# Altium PCB Side_PCB.PcbDoc (part 3 of 3)
Units mm, origin at the board's own origin, x right, y up, seen from the top; angles counter-clockwise.
Board outline 49.91 x 43.31 mm, 2 copper layers (Top Layer, Bottom Layer), stack 1.448 mm thick; 43 components, 50 nets, 194 pads, 110 vias.
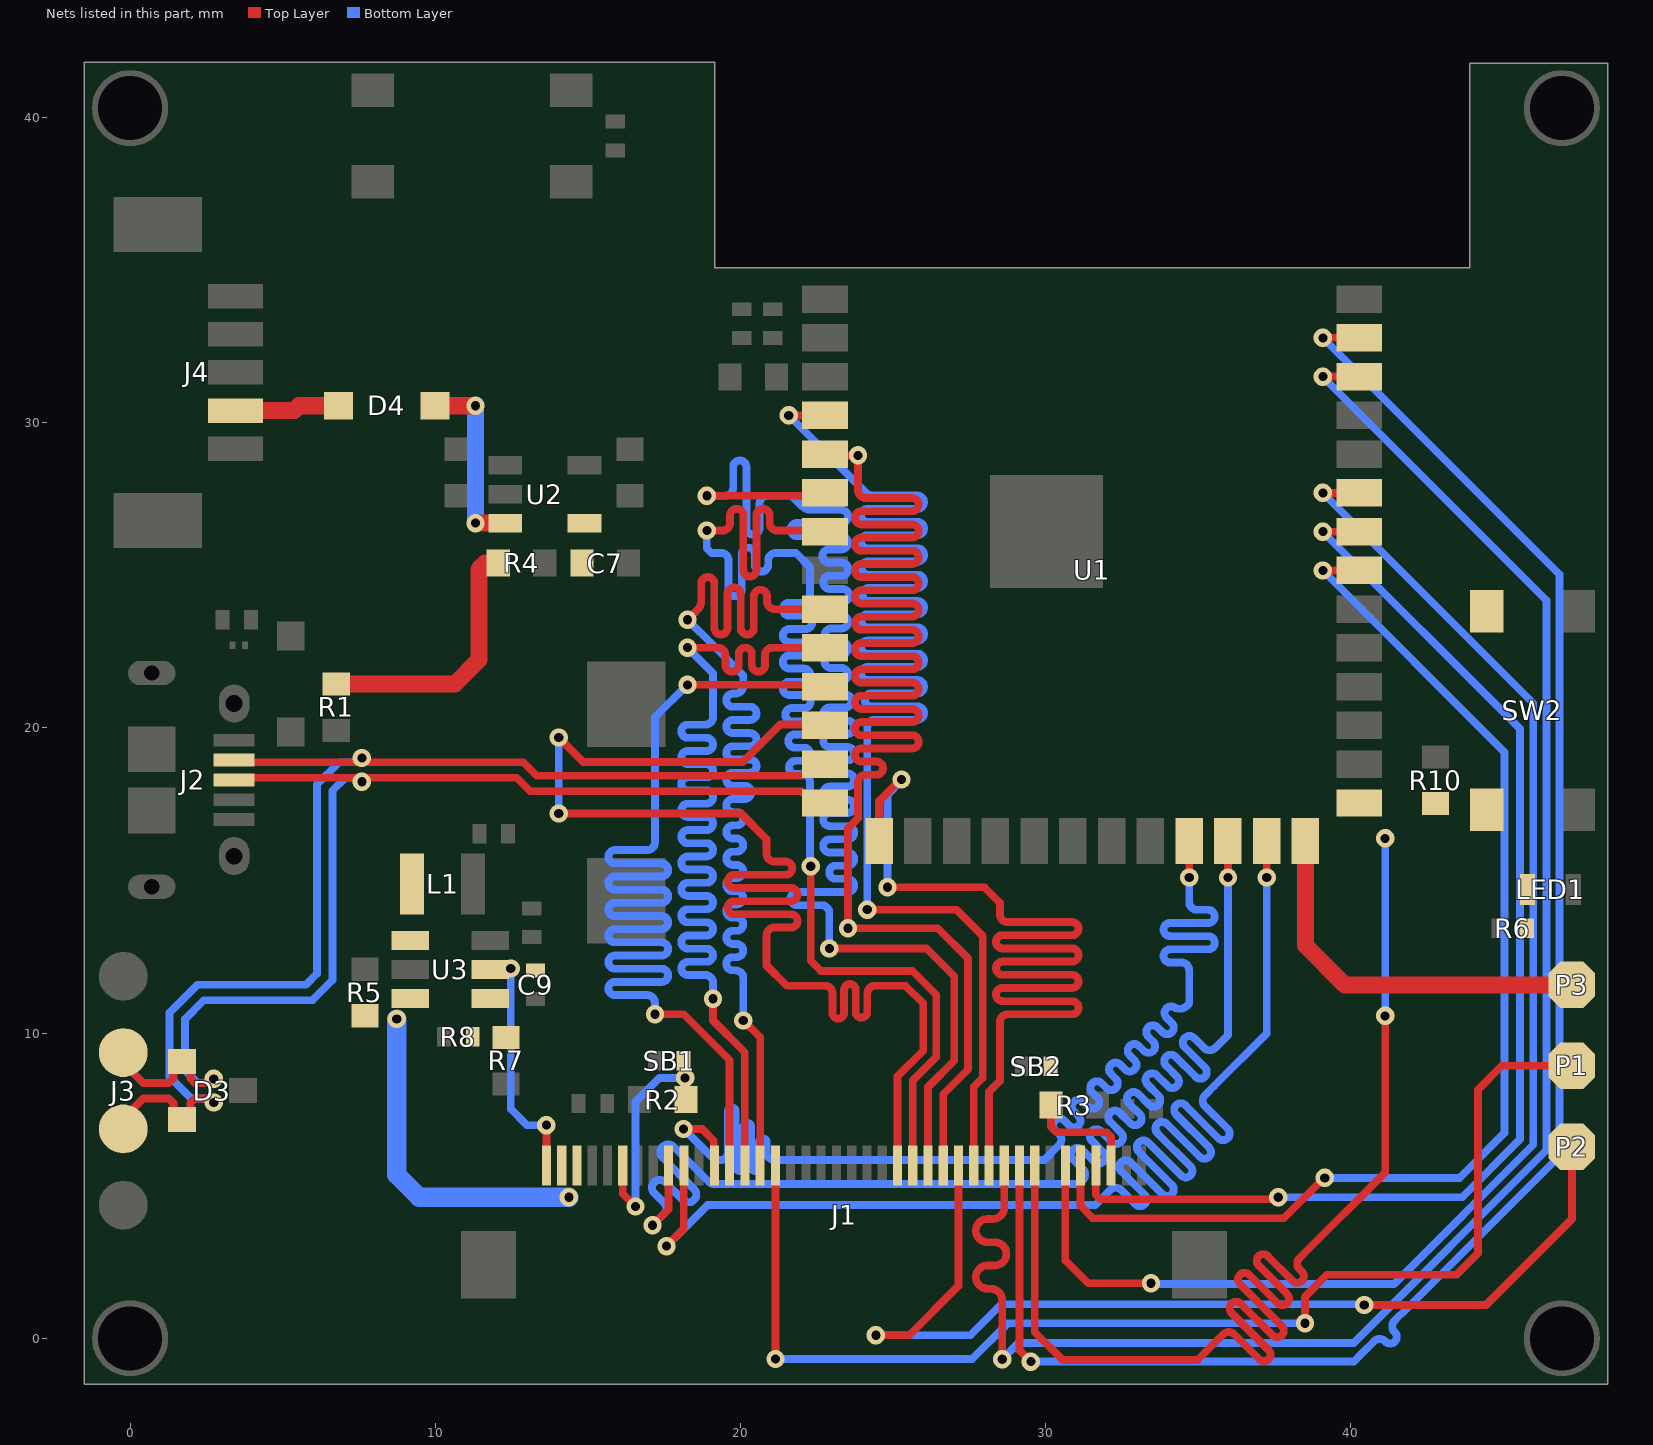
[diagram p2: the nets of this part, all layers, seen from the top]

## Via types
v1: diameter 0.6, hole 0.3, Top Layer to Bottom Layer, tented both sides, 102 vias
v2: diameter 0.6, hole 0.3, Top Layer to Bottom Layer, 8 vias

## Nets (pads, with @x,y where several pads share a name; then routed paths per layer and width w, separated by ;. In a path a pad name is that pad's centre, name@x,y a point inside that pad or via, vN(x,y) a via of type N, cw(c..) or ccw(c..) an arc to the next point about the centre after c; other vN are vias at no path point) (continued)
LCD_DB8: J1.24 U1.12 | length 48
  Top Layer w0.254: v1(14.046,17.196) 20.015,17.196 20.853,16.358 20.853,16.002 20.853,15.875 ccw(c21.107,15.875) 21.107,15.621 21.481,15.621 cw(c21.481,15.405) 21.481,15.189 19.799,15.189 ccw(c19.799,14.973) 19.799,14.757 21.653,14.757 cw(c21.653,14.541) 21.653,14.326 19.799,14.326 ccw(c19.799,14.11) 19.799,13.894 21.653,13.894 cw(c21.653,13.678) 21.653,13.462 21.107,13.462 ccw(c21.107,13.208) 20.853,13.208 20.853,12.55 20.853,12.217 21.514,11.557 21.717,11.557 22.758,11.557 cw(c22.758,11.303) 23.012,11.303 23.012,10.663 ccw(c23.203,10.663) 23.393,10.663 23.393,11.417 cw(c23.584,11.417) 23.774,11.417 23.774,10.698 ccw(c23.965,10.698) 24.155,10.698 24.155,11.303 cw(c24.409,11.303) 24.409,11.557 24.536,11.557 25.404,11.557 25.984,10.976 25.984,9.423 25.143,8.583 J1.24@25.143,5.664 ; v1(14.046,19.685) 14.849,18.883 20.076,18.883 21.311,20.117 U1.12@22.736,20.117
  Bottom Layer w0.254: v1(14.046,17.196) v1(14.046,19.685)
LCD_DB9: J1.25 U1.7 | length 49.5
  Top Layer w0.254: v1(18.898,26.467) 19.279,26.467 19.406,26.467 ccw(c19.406,26.721) 19.66,26.721 19.66,26.962 cw(c19.876,26.962) 20.091,26.962 20.091,25.177 ccw(c20.307,25.177) 20.523,25.177 20.523,26.962 cw(c20.739,26.962) 20.955,26.962 20.955,26.721 ccw(c21.209,26.721) 21.209,26.467 21.641,26.467 22.736,26.467 U1.7@22.771,26.431 ; v1(22.301,15.469) 22.301,12.37 22.631,12.04 25.629,12.04 26.416,11.252 26.416,9.22 25.643,8.448 J1.25@25.643,5.664
  Bottom Layer w0.254: v1(18.898,26.467) 18.898,25.885 18.923,25.86 19.046,25.736 19.357,25.736 cw(c19.357,25.482) 19.611,25.482 19.611,24.533 ccw(c19.827,24.533) 20.042,24.533 20.042,25.692 cw(c20.258,25.692) 20.474,25.692 20.474,25.339 ccw(c20.69,25.339) 20.906,25.339 20.906,25.482 cw(c21.16,25.482) 21.16,25.736 21.287,25.736 21.813,25.736 22.276,25.273 22.276,24.917 22.276,24.359 cw(c22.022,24.359) 22.022,24.105 21.603,24.105 ccw(c21.603,23.889) 21.603,23.673 22.131,23.673 cw(c22.131,23.457) 22.131,23.241 21.603,23.241 ccw(c21.603,23.025) 21.603,22.809 22.118,22.809 cw(c22.118,22.593) 22.118,22.377 21.603,22.377 ccw(c21.603,22.161) 21.603,21.946 22.074,21.946 cw(c22.074,21.73) 22.074,21.514 21.603,21.514 ccw(c21.603,21.298) 21.603,21.082 22.083,21.082 cw(c22.083,20.866) 22.083,20.65 21.686,20.65 ccw(c21.686,20.434) 21.686,20.218 22.074,20.218 cw(c22.074,20.002) 22.074,19.787 21.778,19.787 ccw(c21.778,19.571) 21.778,19.355 22.074,19.355 cw(c22.074,19.139) 22.074,18.923 21.806,18.923 ccw(c21.806,18.707) 21.806,18.491 22.022,18.491 cw(c22.022,18.237) 22.276,18.237 22.276,17.551 22.276,15.494 v1(22.301,15.469)
LCD_DB10: J1.26 U1.6 | length 63.4
  Top Layer w0.254: v1(18.898,27.61) 22.68,27.61 U1.6@22.771,27.701 ; v1(22.911,12.776) 26.086,12.776 27,11.862 27,9.093 26.143,8.236 J1.26@26.143,5.664
  Bottom Layer w0.254: v1(18.898,27.61) 19.38,27.61 19.507,27.61 ccw(c19.507,27.864) 19.761,27.864 19.761,28.549 cw(c19.977,28.549) 20.193,28.549 20.193,26.556 ccw(c20.409,26.556) 20.625,26.556 20.625,27.356 cw(c20.879,27.356) 20.879,27.61 21.641,27.61 21.672,27.61 21.901,27.381 22.028,27.254 22.029,27.253 ccw(c22.289,27.515) 22.289,27.146 23.304,27.146 cw(c23.304,26.93) 23.304,26.714 21.857,26.714 ccw(c21.857,26.498) 21.857,26.283 23.304,26.283 cw(c23.304,26.067) 23.304,25.851 22.898,25.851 ccw(c22.898,25.635) 22.898,25.419 23.312,25.419 cw(c23.312,25.203) 23.312,24.987 22.923,24.987 ccw(c22.923,24.771) 22.923,24.555 23.349,24.555 cw(c23.349,24.339) 23.349,24.124 22.984,24.124 ccw(c22.984,23.908) 22.984,23.692 23.307,23.692 cw(c23.307,23.476) 23.307,23.26 22.981,23.26 ccw(c22.981,23.044) 22.981,22.828 23.304,22.828 cw(c23.304,22.612) 23.304,22.396 22.968,22.396 ccw(c22.968,22.18) 22.968,21.965 23.305,21.965 cw(c23.305,21.749) 23.305,21.533 22.924,21.533 ccw(c22.924,21.317) 22.924,21.101 23.427,21.101 cw(c23.427,20.885) 23.427,20.669 22.923,20.669 ccw(c22.923,20.453) 22.923,20.237 23.508,20.237 cw(c23.508,20.021) 23.508,19.806 22.923,19.806 ccw(c22.923,19.59) 22.923,19.374 23.508,19.374 cw(c23.508,19.158) 23.508,18.942 22.923,18.942 ccw(c22.923,18.726) 22.923,18.51 23.508,18.51 cw(c23.508,18.294) 23.508,18.078 22.923,18.078 ccw(c22.923,17.862) 22.923,17.647 23.508,17.647 cw(c23.508,17.431) 23.508,17.215 22.923,17.215 ccw(c22.923,16.999) 22.923,16.783 23.508,16.783 cw(c23.508,16.567) 23.508,16.351 22.923,16.351 ccw(c22.923,16.135) 22.923,15.919 23.508,15.919 cw(c23.508,15.703) 23.508,15.488 23.122,15.488 ccw(c23.122,15.272) 23.122,15.056 23.508,15.056 cw(c23.508,14.84) 23.508,14.624 21.857,14.624 ccw(c21.857,14.408) 21.857,14.192 22.657,14.192 cw(c22.657,13.938) 22.911,13.938 22.911,13.016 v1@22.911,12.645
LCD_DB11: J1.27 U1.5 | length 67.5
  Top Layer w0.254: U1.5@22.771,28.971 22.812,28.931 v1(23.851,28.931) 23.851,28.372 23.851,27.788 ccw(c24.105,27.788) 24.105,27.534 25.623,27.534 cw(c25.623,27.318) 25.623,27.102 23.966,27.102 ccw(c23.966,26.886) 23.966,26.67 25.623,26.67 cw(c25.623,26.454) 25.623,26.238 23.966,26.238 ccw(c23.966,26.022) 23.966,25.806 25.623,25.806 cw(c25.623,25.591) 25.623,25.375 23.966,25.375 ccw(c23.966,25.159) 23.966,24.943 25.623,24.943 cw(c25.623,24.727) 25.623,24.511 23.966,24.511 ccw(c23.966,24.295) 23.966,24.079 25.623,24.079 cw(c25.623,23.863) 25.623,23.647 23.966,23.647 ccw(c23.966,23.432) 23.966,23.216 25.623,23.216 cw(c25.623,23) 25.623,22.784 23.966,22.784 ccw(c23.966,22.568) 23.966,22.352 25.623,22.352 cw(c25.623,22.136) 25.623,21.92 23.966,21.92 ccw(c23.966,21.704) 23.966,21.488 25.623,21.488 cw(c25.623,21.273) 25.623,21.057 23.966,21.057 ccw(c23.966,20.841) 23.966,20.625 25.623,20.625 cw(c25.623,20.409) 25.623,20.193 23.966,20.193 ccw(c23.966,19.977) 23.966,19.761 25.623,19.761 cw(c25.623,19.545) 25.623,19.329 23.966,19.329 ccw(c23.966,19.114) 23.966,18.898 24.452,18.898 cw(c24.452,18.682) 24.452,18.466 24.105,18.466 ccw(c24.105,18.212) 23.851,18.212 23.851,17.653 23.851,17.043 23.52,16.713 v1(23.52,13.437) 26.467,13.437 27.457,12.446 27.457,8.814 26.643,8 J1.27@26.643,5.664
LCD_DB13: J1.29 U1.4 | length 63.3
  Top Layer w0.254: v1(21.581,30.241) U1.4@22.771,30.241 ; v1(24.155,14.046) 27.076,14.046 27.94,13.183 27.94,8.534 27.643,8.238 J1.29@27.643,5.664
  Bottom Layer w0.254: v1(21.581,30.241) 23.974,27.848 24.101,27.721 ccw(c24.362,27.981) 24.362,27.613 25.798,27.613 cw(c25.798,27.397) 25.798,27.181 24.168,27.181 ccw(c24.168,26.965) 24.168,26.749 25.798,26.749 cw(c25.798,26.533) 25.798,26.317 24.168,26.317 ccw(c24.168,26.101) 24.168,25.885 25.798,25.885 cw(c25.798,25.669) 25.798,25.454 24.176,25.454 ccw(c24.176,25.238) 24.176,25.022 25.798,25.022 cw(c25.798,24.806) 25.798,24.59 24.213,24.59 ccw(c24.213,24.374) 24.213,24.158 25.798,24.158 cw(c25.798,23.942) 25.798,23.726 24.171,23.726 ccw(c24.171,23.51) 24.171,23.295 25.798,23.295 cw(c25.798,23.079) 25.798,22.863 24.168,22.863 ccw(c24.168,22.647) 24.168,22.431 25.798,22.431 cw(c25.798,22.215) 25.798,21.999 24.169,21.999 ccw(c24.169,21.783) 24.169,21.567 25.798,21.567 cw(c25.798,21.351) 25.798,21.136 24.291,21.136 ccw(c24.291,20.92) 24.291,20.704 25.798,20.704 cw(c25.798,20.488) 25.798,20.272 24.409,20.272 ccw(c24.409,20.018) 24.155,20.018 24.155,19.228 v1(24.155,14.046)
LCD_DB14: J1.30 U1.15 | length 38.6
  Top Layer w0.254: U1.15@24.541,16.291 24.541,17.607 25.248,18.313 v1(25.273,18.313) ; v1(24.816,14.783) 27.991,14.783 28.499,14.275 28.499,14.021 28.499,13.894 ccw(c28.753,13.894) 28.753,13.64 30.86,13.64 cw(c30.86,13.424) 30.86,13.208 28.588,13.208 ccw(c28.588,12.992) 28.588,12.776 30.86,12.776 cw(c30.86,12.56) 30.86,12.344 28.588,12.344 ccw(c28.588,12.128) 28.588,11.913 30.86,11.913 cw(c30.86,11.697) 30.86,11.481 28.588,11.481 ccw(c28.588,11.265) 28.588,11.049 30.86,11.049 cw(c30.86,10.833) 30.86,10.617 28.753,10.617 ccw(c28.753,10.363) 28.499,10.363 28.499,8.433 28.143,8.077 J1.30@28.143,5.664
  Bottom Layer w0.254: v1(24.816,14.783) 24.816,17.808 25.273,18.265 v1(25.273,18.313)
LCD_DB15: J1.31 U1.38 | length 59.1
  Top Layer w0.254: v1(28.575,-0.686) 28.575,1.118 28.575,1.245 ccw(c28.194,1.245) 28.194,1.626 28.091,1.626 cw(c28.091,2.007) 28.091,2.388 28.331,2.388 ccw(c28.331,2.769) 28.331,3.15 28.091,3.15 cw(c28.091,3.531) 28.091,3.912 28.262,3.912 ccw(c28.262,4.293) 28.643,4.293 28.643,5.59 J1.31@28.643,5.664 ; v1(39.081,31.511) U1.38@40.271,31.511
  Bottom Layer w0.254: v1(28.575,-0.686) 29.108,-0.152 40.091,-0.152 46.406,6.163 46.406,24.186 v1(39.081,31.511)
LCD_DB16: J1.32 U1.39 | length 58.5
  Top Layer w0.254: J1.32@29.143,5.664 29.143,-0.391 v1(29.515,-0.762) ; v1(39.081,32.781) U1.39@40.271,32.781
  Bottom Layer w0.254: v1(29.515,-0.762) 40.092,-0.762 40.366,-0.488 40.761,-0.093 cw(c40.941,-0.272) 41.12,-0.093 41.135,-0.108 ccw(c41.288,0.045) 41.441,-0.108 ccw(c41.288,0.045) 41.441,0.197 41.425,0.213 cw(c41.605,0.392) 41.425,0.572 41.876,1.023 46.838,5.984 46.838,25.024 v1(39.081,32.781)
LCD_DB17: J1.33 R10.2 SW2.1 SW2.2 U1.27 | length 43
  Top Layer w0.254: J1.33@29.643,5.664 29.643,0.202 30.556,-0.711 34.976,-0.711 35.065,-0.621 35.819,0.132 cw(c35.998,-0.048) 36.178,0.132 36.996,-0.686 ccw(c37.149,-0.533) 37.301,-0.686 ccw(c37.149,-0.533) 37.301,-0.381 36.089,0.831 cw(c36.242,0.984) 36.089,1.136 cw(c36.242,0.984) 36.395,1.136 37.432,0.1 ccw(c37.584,0.252) 37.737,0.1 ccw(c37.584,0.252) 37.737,0.405 36.365,1.777 cw(c36.518,1.93) 36.365,2.082 cw(c36.518,1.93) 36.67,2.082 37.605,1.148 ccw(c37.757,1.301) 37.91,1.148 ccw(c37.757,1.301) 37.91,1.453 36.976,2.388 cw(c37.128,2.54) 36.976,2.693 cw(c37.128,2.54) 37.281,2.693 38.093,1.881 ccw(c38.246,2.033) 38.398,1.881 ccw(c38.246,2.033) 38.398,2.186 38.315,2.269 cw(c38.495,2.449) 38.315,2.628 38.405,2.718 41.123,5.436 v1(41.123,10.566)
  Bottom Layer w0.254: v1(41.123,10.566) v1(41.123,16.383)
LCD_DE: J1.13 U1.11 | length 42.7
  Top Layer w0.254: v1(17.196,10.617) 18.136,10.617 19.643,9.109 J1.13@19.643,5.664 ; v1(18.263,21.412) 22.711,21.412 U1.11@22.771,21.351
  Bottom Layer w0.254: v1(17.196,10.617) 17.196,10.867 17.196,10.994 ccw(c16.942,10.994) 16.942,11.248 15.888,11.248 cw(c15.888,11.463) 15.888,11.679 17.413,11.679 ccw(c17.413,11.895) 17.413,12.111 15.888,12.111 cw(c15.888,12.327) 15.888,12.543 17.413,12.543 ccw(c17.413,12.759) 17.413,12.975 15.888,12.975 cw(c15.888,13.191) 15.888,13.407 17.413,13.407 ccw(c17.413,13.622) 17.413,13.838 15.888,13.838 cw(c15.888,14.054) 15.888,14.27 17.413,14.27 ccw(c17.413,14.486) 17.413,14.702 15.888,14.702 cw(c15.888,14.918) 15.888,15.134 17.413,15.134 ccw(c17.413,15.35) 17.413,15.566 15.888,15.566 cw(c15.888,15.781) 15.888,15.997 16.942,15.997 ccw(c16.942,16.251) 17.196,16.251 17.196,17.138 17.196,20.345 v1(18.263,21.412)
LCD_HSYNC: J1.15 U1.9 | length 41.8
  Top Layer w0.254: v1(18.263,23.546) 18.476,23.759 18.603,23.886 ccw(c18.342,24.147) 18.711,24.147 18.711,24.728 cw(c18.927,24.728) 19.143,24.728 19.143,23.279 ccw(c19.359,23.279) 19.575,23.279 19.575,24.387 cw(c19.791,24.387) 20.006,24.387 20.006,23.279 ccw(c20.222,23.279) 20.438,23.279 20.438,24.315 cw(c20.654,24.315) 20.87,24.315 20.87,24.145 ccw(c21.124,24.145) 21.124,23.891 22.555,23.891 U1.9@22.771,23.891 ; v1(20.091,10.414) 20.643,9.862 J1.15@20.643,5.664
  Bottom Layer w0.254: v1(18.263,23.546) 19.152,22.657 20.091,21.717 20.091,21.38 cw(c19.837,21.38) 19.837,21.126 19.748,21.126 ccw(c19.748,20.911) 19.748,20.695 20.307,20.695 cw(c20.307,20.479) 20.307,20.263 19.749,20.263 ccw(c19.749,20.047) 19.749,19.831 20.307,19.831 cw(c20.307,19.615) 20.307,19.399 19.749,19.399 ccw(c19.749,19.183) 19.749,18.967 20.307,18.967 cw(c20.307,18.752) 20.307,18.536 19.749,18.536 ccw(c19.749,18.32) 19.749,18.104 20.133,18.104 cw(c20.133,17.888) 20.133,17.672 19.749,17.672 ccw(c19.749,17.456) 19.749,17.24 19.875,17.24 cw(c19.875,17.024) 19.875,16.808 19.749,16.808 ccw(c19.749,16.593) 19.749,16.377 19.875,16.377 cw(c19.875,16.161) 19.875,15.945 19.749,15.945 ccw(c19.749,15.729) 19.749,15.513 19.875,15.513 cw(c19.875,15.297) 19.875,15.081 19.749,15.081 ccw(c19.749,14.865) 19.749,14.649 19.875,14.649 cw(c19.875,14.434) 19.875,14.218 19.749,14.218 ccw(c19.749,14.002) 19.749,13.786 19.875,13.786 cw(c19.875,13.57) 19.875,13.354 19.749,13.354 ccw(c19.749,13.138) 19.749,12.922 19.875,12.922 cw(c19.875,12.706) 19.875,12.49 19.749,12.49 ccw(c19.749,12.275) 19.749,12.059 19.837,12.059 cw(c19.837,11.805) 20.091,11.805 20.091,10.58 v1(20.091,10.414)
LCD_PCLK: J1.12 U1.23 | length 46.6
  Top Layer w0.254: v1(18.136,6.858) 18.745,6.858 19.126,6.477 19.126,5.681 J1.12@19.143,5.664 ; v1(34.701,15.101) U1.23@34.701,16.291
  Bottom Layer w0.254: v1(18.136,6.858) 19.152,5.842 19.209,5.842 19.336,5.842 ccw(c19.336,6.096) 19.59,6.096 19.59,7.434 cw(c19.717,7.434) 19.844,7.434 19.844,5.613 ccw(c19.971,5.613) 20.098,5.613 20.098,6.926 cw(c20.225,6.926) 20.352,6.926 20.352,5.613 ccw(c20.479,5.613) 20.606,5.613 20.606,6.418 cw(c20.733,6.418) 20.86,6.418 20.86,6.096 ccw(c21.114,6.096) 21.114,5.842 22.657,5.842 29.178,5.842 29.947,5.842 30.442,6.338 ccw(c30.263,6.517) 30.442,6.697 30.305,6.834 cw(c30.458,6.987) 30.305,7.139 cw(c30.458,6.987) 30.61,7.139 30.774,6.975 ccw(c30.927,7.128) 31.08,6.975 ccw(c30.927,7.128) 31.08,7.28 30.916,7.445 cw(c31.068,7.597) 30.916,7.75 cw(c31.068,7.597) 31.221,7.75 31.385,7.586 ccw(c31.538,7.738) 31.69,7.586 ccw(c31.538,7.738) 31.69,7.891 31.526,8.055 cw(c31.679,8.208) 31.526,8.36 cw(c31.679,8.208) 31.832,8.36 31.996,8.196 ccw(c32.148,8.349) 32.301,8.196 ccw(c32.148,8.349) 32.301,8.502 32.137,8.666 cw(c32.29,8.818) 32.137,8.971 cw(c32.29,8.818) 32.442,8.971 32.606,8.807 ccw(c32.759,8.96) 32.912,8.807 ccw(c32.759,8.96) 32.912,9.112 32.748,9.276 cw(c32.9,9.429) 32.748,9.582 cw(c32.9,9.429) 33.053,9.582 33.217,9.418 ccw(c33.37,9.57) 33.522,9.418 ccw(c33.37,9.57) 33.522,9.723 33.358,9.887 cw(c33.511,10.04) 33.358,10.193 cw(c33.511,10.04) 33.663,10.193 33.828,10.028 ccw(c33.98,10.181) 34.133,10.028 ccw(c33.98,10.181) 34.133,10.334 33.958,10.508 cw(c34.111,10.661) 33.958,10.814 cw(c34.111,10.661) 34.264,10.814 ccw(c34.378,11.164) 34.701,10.987 34.701,11.933 34.701,12.06 ccw(c34.447,12.06) 34.447,12.314 34.079,12.314 cw(c34.079,12.53) 34.079,12.746 35.324,12.746 ccw(c35.324,12.962) 35.324,13.178 34.079,13.178 cw(c34.079,13.394) 34.079,13.609 35.324,13.609 ccw(c35.324,13.825) 35.324,14.041 34.955,14.041 cw(c34.955,14.295) 34.701,14.295 34.701,14.707 v1(34.701,15.101)
LCD_RST: J1.6 R2.2 SB1.1 | length 6.9
  Top Layer w0.254: J1.6@16.143,5.664 16.143,4.735 v1(16.561,4.318) ; R2.2@18.161,8.153 R2.2@18.186,8.128
  Bottom Layer w0.254: v1(16.561,4.318) 16.561,7.747 17.348,8.534 v1(18.186,8.534)
LCD_SCK: J1.10 U1.25 | length 47.7
  Top Layer w0.254: v1(17.577,3.023) 18.143,3.589 J1.10@18.143,5.664 ; v1(37.241,15.101) U1.25@37.241,16.291
  Bottom Layer w0.254: v1(17.577,3.023) 18.923,4.369 31.623,4.369 31.718,4.464 32.113,4.859 cw(c32.293,4.68) 32.473,4.859 32.937,4.394 ccw(c33.09,4.547) 33.243,4.394 ccw(c33.09,4.547) 33.243,4.7 32.472,5.47 cw(c32.625,5.623) 32.472,5.776 cw(c32.625,5.623) 32.778,5.776 33.827,4.726 ccw(c33.98,4.879) 34.133,4.726 ccw(c33.98,4.879) 34.133,5.031 33.05,6.114 cw(c33.203,6.267) 33.05,6.419 cw(c33.203,6.267) 33.355,6.419 34.438,5.337 ccw(c34.591,5.489) 34.743,5.337 ccw(c34.591,5.489) 34.743,5.642 33.661,6.725 cw(c33.813,6.877) 33.661,7.03 cw(c33.813,6.877) 33.966,7.03 35.049,5.947 ccw(c35.201,6.1) 35.354,5.947 ccw(c35.201,6.1) 35.354,6.253 34.271,7.335 cw(c34.424,7.488) 34.271,7.641 cw(c34.424,7.488) 34.577,7.641 35.659,6.558 ccw(c35.812,6.711) 35.965,6.558 ccw(c35.812,6.711) 35.965,6.863 35.221,7.607 cw(c35.4,7.787) 35.221,7.966 35.526,8.271 37.241,9.987 v1(37.241,15.101)
LCD_SDA: J1.9 U1.24 | length 46.7
  Top Layer w0.254: v1(17.12,3.708) 17.643,4.232 J1.9@17.643,5.664 ; v1(35.971,15.101) U1.24@35.971,16.291
  Bottom Layer w0.254: v1(17.12,3.708) 17.403,3.991 17.492,4.081 ccw(c17.313,4.261) 17.492,4.44 17.172,4.761 cw(c17.352,4.94) 17.172,5.12 cw(c17.352,4.94) 17.531,5.12 18.118,4.533 ccw(c18.297,4.713) 18.477,4.533 ccw(c18.297,4.713) 18.477,4.893 17.449,5.92 cw(c17.629,6.1) 17.449,6.28 cw(c17.629,6.1) 17.809,6.28 18.959,5.129 ccw(c19.139,5.309) 19.139,5.055 20.193,5.055 28.371,5.055 31.09,5.055 31.221,5.186 ccw(c31.041,5.366) 31.221,5.545 30.893,5.873 cw(c31.046,6.026) 30.893,6.178 cw(c31.046,6.026) 31.199,6.178 31.586,5.791 ccw(c31.739,5.943) 31.892,5.791 ccw(c31.739,5.943) 31.892,6.096 31.504,6.484 cw(c31.657,6.636) 31.504,6.789 cw(c31.657,6.636) 31.809,6.789 32.164,6.434 ccw(c32.317,6.587) 32.469,6.434 ccw(c32.317,6.587) 32.469,6.74 32.115,7.094 cw(c32.267,7.247) 32.115,7.4 cw(c32.267,7.247) 32.42,7.4 32.775,7.045 ccw(c32.927,7.198) 33.08,7.045 ccw(c32.927,7.198) 33.08,7.35 32.725,7.705 cw(c32.878,7.858) 32.725,8.01 cw(c32.878,7.858) 33.031,8.01 33.385,7.656 ccw(c33.538,7.808) 33.691,7.656 ccw(c33.538,7.808) 33.691,7.961 33.336,8.316 cw(c33.489,8.468) 33.336,8.621 cw(c33.489,8.468) 33.641,8.621 33.996,8.266 ccw(c34.149,8.419) 34.301,8.266 ccw(c34.149,8.419) 34.301,8.572 33.947,8.926 cw(c34.099,9.079) 33.947,9.232 cw(c34.099,9.079) 34.252,9.232 34.911,8.573 ccw(c35.064,8.725) 35.216,8.573 ccw(c35.064,8.725) 35.216,8.878 34.557,9.537 cw(c34.71,9.69) 34.557,9.842 cw(c34.71,9.69) 34.863,9.842 35.19,9.515 ccw(c35.37,9.694) 35.55,9.515 35.971,9.936 35.971,10.651 v1(35.971,15.101)
LCD_VSYNC: J1.14 U1.10 | length 41.7
  Top Layer w0.254: v1(18.263,22.631) 18.694,22.631 19.253,22.631 cw(c19.253,22.377) 19.507,22.377 19.507,22.06 ccw(c19.723,22.06) 19.939,22.06 19.939,22.415 cw(c20.155,22.415) 20.371,22.415 20.371,22.06 ccw(c20.587,22.06) 20.803,22.06 20.803,22.377 cw(c21.057,22.377) 21.057,22.631 22.2,22.631 22.761,22.631 U1.10@22.771,22.621 ; v1(19.101,11.125) 19.101,10.414 20.143,9.371 J1.14@20.143,5.664
  Bottom Layer w0.254: v1(18.263,22.631) 19.101,21.793 19.101,20.922 19.101,20.363 cw(c18.847,20.363) 18.847,20.109 18.277,20.109 ccw(c18.277,19.893) 18.277,19.677 18.885,19.677 cw(c18.885,19.461) 18.885,19.245 18.277,19.245 ccw(c18.277,19.029) 18.277,18.813 18.885,18.813 cw(c18.885,18.597) 18.885,18.382 18.277,18.382 ccw(c18.277,18.166) 18.277,17.95 18.885,17.95 cw(c18.885,17.734) 18.885,17.518 18.277,17.518 ccw(c18.277,17.302) 18.277,17.086 18.885,17.086 cw(c18.885,16.87) 18.885,16.654 18.277,16.654 ccw(c18.277,16.438) 18.277,16.223 18.885,16.223 cw(c18.885,16.007) 18.885,15.791 18.277,15.791 ccw(c18.277,15.575) 18.277,15.359 18.885,15.359 cw(c18.885,15.143) 18.885,14.927 18.277,14.927 ccw(c18.277,14.711) 18.277,14.495 18.885,14.495 cw(c18.885,14.279) 18.885,14.064 18.277,14.064 ccw(c18.277,13.848) 18.277,13.632 18.885,13.632 cw(c18.885,13.416) 18.885,13.2 18.277,13.2 ccw(c18.277,12.984) 18.277,12.768 18.885,12.768 cw(c18.885,12.552) 18.885,12.336 18.277,12.336 ccw(c18.277,12.12) 18.277,11.905 18.847,11.905 cw(c18.847,11.651) 19.101,11.651 v1(19.101,11.125)
LEDA: C9.1 J1.1 U3.5 | length 7.3
  Top Layer w0.254: v1@12.548,12.09 v1@12.548,12.116 ; J1.1@13.643,5.664 v1@13.643,6.985
  Bottom Layer w0.254: v1(12.471,12.116) 12.471,7.518 13.005,6.985 v1(13.64,6.985)
LEDK: J1.2 J1.3 R5.2 U3.3 | length 11
  Bottom Layer w0.635: v1(8.738,10.465) 8.738,5.359 9.474,4.623 v1(14.376,4.623)
NetC7_2: C7.2 U2.4
NetD4_1: D4.1 J4.4 | length 3.4
  Top Layer w0.559: J4.4@3.459,30.398 5.379,30.398 5.537,30.556 D4.1@6.832,30.556
NetJ1_16: J1.16 P1.1 | length 40.1
  Top Layer w0.254: v2@21.12,-0.674 21.143,-0.651 J1.16@21.143,5.664 ; v1(38.494,0.493) 38.494,1.366 39.211,2.083 43.459,2.083 44.166,2.789 44.166,8.149 44.945,8.928 P1.1@47.244,8.928
  Bottom Layer w0.254: v2@21.12,-0.674 27.596,-0.674 28.763,0.493 v1(38.494,0.493)
  other v2: 21.146,-0.674
NetJ1_28: J1.28 P2.1 | length 34.1
  Top Layer w0.254: v1(24.435,0.102) 25.527,0.102 27.143,1.718 J1.28@27.143,5.664 ; v1(40.437,1.092) 44.425,1.092 47.244,3.912 P2.1@47.244,6.274
  Bottom Layer w0.254: v1(24.435,0.102) 27.534,0.102 28.55,1.118 40.411,1.118 v1(40.437,1.092)
NetL1_2: L1.2 U3.1
NetLED1_1: LED1.1 R6.2
NetP3_1: P3.1 U1.26 | length 12.7
  Top Layer w0.559: U1.26@38.511,16.291 38.511,12.873 39.802,11.582 P3.1@47.244,11.582
NetR7_2: R7.2 R8.1 U3.4
TP_INT: J1.35 U1.35 | length 46.1
  Top Layer w0.254: J1.35@30.643,5.664 30.643,2.554 31.394,1.803 v1(33.452,1.803) ; v1(39.081,27.701) U1.35@40.271,27.701
  Bottom Layer w0.254: v1(33.452,1.803) 33.477,1.778 41.41,1.778 45.974,6.342 45.974,20.808 v1(39.081,27.701)
TP_RST: J1.38 R3.2 SB2.1 | length 3.8
  Top Layer w0.254: R3.2@30.175,7.645 30.175,6.934 30.353,6.756 31.995,6.756 32.143,6.608 J1.38@32.143,5.664
TP_SCL: J1.37 U1.34 | length 39.5
  Top Layer w0.254: J1.37@31.643,5.664 31.643,4.705 31.792,4.557 37.551,4.557 v1(37.617,4.623) ; v1(39.081,26.431) U1.34@40.271,26.431
  Bottom Layer w0.254: v1(37.617,4.623) 43.644,4.623 45.542,6.521 45.542,19.97 v1(39.081,26.431)
TP_SDA: J1.36 U1.33 | length 38.6
  Top Layer w0.254: J1.36@31.143,5.664 31.143,4.34 31.547,3.937 37.803,3.937 39.124,5.258 v1(39.141,5.258) ; v1(39.081,25.161) U1.33@40.271,25.161
  Bottom Layer w0.254: v1(39.081,25.161) 45.034,19.208 45.034,6.731 43.561,5.258 v1(39.141,5.258)
USB_D_N: D3.2 J2.2 J3.2 U1.13 | length 40.8
  Top Layer w0.254: J3.2@-0.224,6.864 -0.224,7.205 0.432,7.86 1.269,7.86 1.418,7.711 1.418,7.443 D3.2@1.697,7.164 1.977,7.443 1.977,7.711 2.125,7.86 v1@2.515,7.86 ; J2.2@3.409,18.949 3.48,18.878 v1@7.366,18.878 ; v1@7.823,18.878 12.879,18.878 13.327,18.43 22,18.43 22.058,18.488 22.448,18.488 U1.13@22.771,18.811
  Bottom Layer w0.254: v1(2.743,7.725) 2.65,7.725 2.515,7.86 2.001,7.86 1.292,8.569 1.292,10.672 2.208,11.588 5.764,11.588 6.121,11.945 6.121,18.148 6.852,18.878 7.366,18.878 7.501,19.013 v1(7.595,19.013)
USB_D_P: D3.1 J2.3 J3.3 U1.14 | length 39.1
  Top Layer w0.254: J3.3@-0.224,9.364 -0.224,9.023 0.432,8.368 1.269,8.368 1.418,8.517 1.418,8.785 D3.1@1.697,9.064 1.977,8.785 1.977,8.517 2.125,8.368 v1@2.515,8.368 ; J2.3@3.409,18.299 3.48,18.37 v1@7.366,18.37 ; v1@7.823,18.37 12.668,18.37 13.116,17.922 22,17.922 22.058,17.864 22.448,17.864 U1.14@22.771,17.541
  Bottom Layer w0.254: v1(2.743,8.503) 2.65,8.503 2.515,8.368 2.211,8.368 1.8,8.779 1.8,10.461 2.418,11.08 5.974,11.08 6.629,11.735 6.629,15.36 ; 6.629,15.367 6.629,17.937 7.062,18.37 7.366,18.37 7.501,18.236 v1(7.595,18.236)
V_EN: D4.2 R1.2 R4.2 U2.3 | length 14.8
  Top Layer w0.559: R1.2@6.756,21.438 10.643,21.438 11.427,22.222 11.427,25.197 11.63,25.4 R4.2@12.065,25.4 ; D4.2@9.982,30.556 v1(11.318,30.556) ; v1(11.318,26.711) U2.3@12.289,26.711
  Bottom Layer w0.559: v1(11.318,26.711) v1(11.318,30.556)
pads on no net: J1.7 J1.8 J2.4 U1.28 U1.29 U1.30

## Polygon pours and split planes (outlines as drawn)
GND on Top Layer "GND_L01_P000" (solid, remove dead copper, pour order 0): 0.914,0.914 0.914,39.395 cw(c0.915,39.395) 0.915,39.396 17.171,39.396 17.171,32.665 46,32.665 46,0.915 cw(c45.999,0.915) 45.999,0.914
GND on Bottom Layer "GND_L02_P001" (solid, remove dead copper, pour order 1): 0.914,0.914 0.914,39.395 cw(c0.915,39.395) 0.915,39.396 17.171,39.396 17.171,32.665 46,32.665 46,0.915 cw(c45.999,0.915) 45.999,0.914

## Other copper
Top Layer:
  rectangle net 5V: -1.118,2.286 0.686,5.131
  rectangle net GND: 25.654,28.169 36.83,34.595
  rectangle net GND: 1.702,33.757 4.445,41.478
  rectangle net GND: 16.637,33.477 18.872,41.478
  rectangle net GND: 1.702,39.624 18.821,41.478
  rectangle net EN_: 7.188,37.211 16.256,39.167
  rectangle net 3.3V: 31.293,8.433 38.837,9.652
  rectangle net NetL1_2: 8.56,12.725 9.83,15.926
  rectangle net LEDK: 13.995,4.318 14.808,6.325
  rectangle net 3.3V: 15.342,7.137 16.459,11.862
  rectangle net LCD_RST: 17.78,7.366 18.644,9.423
  rectangle net TP_RST: 29.743,7.188 30.607,9.246
  region net 3.3V: 33.02,9.652 31.293,9.652 31.293,7.188 33.02,7.188
  rectangle net 3.3V: 15.342,7.137 17.069,8.128
  rectangle net 3.3V: 13.995,11.659 17.577,15.723
  rectangle net GND: 11.938,13.843 13.564,16.891
  rectangle net 3.3V: 10.744,12.659 11.659,16.891
  rectangle net 3.3V: 10.846,12.659 16.129,13.421
  rectangle net LEDA: 11.1,11.709 13.767,12.471
  rectangle net NetR7_2: 10.998,9.474 12.675,11.506
  rectangle net LEDK: 7.163,10.058 9.83,11.521
  rectangle net GND: 3.759,11.709 9.83,12.471
  rectangle net GND: 3.226,7.696 4.216,11.303
  rectangle net 5V#: 2.642,19.38 7.214,19.837
  rectangle net 5V#: 4.648,19.736 7.214,20.523
  rectangle net 5V: 2.54,28.296 10.846,29.591
  rectangle net 5V: 10.312,28.296 12.852,29.591
  region net 3.3V: 20.091,33.249 14.326,33.249 14.326,28.204 20.091,28.204
  rectangle net GND: 10.262,27.229 16.84,28.016
  rectangle net GND: 15.748,24.841 17.704,28.016
  rectangle net V_EN: 10.998,24.917 12.852,27.041
  rectangle net NetC7_2: 14.259,24.917 15.452,27.041
  rectangle net GND: -1.321,33.757 4.445,37.744
  rectangle net GND: -1.321,27.686 2.083,37.516
  rectangle net GND: 2.819,20.091 4.14,21.946
  rectangle net GND: 1.626,10.897 4.216,16.561
  rectangle net GND: -1.321,10.897 2.108,20.371
  region net GND: 3.461,28.067 -1.321,28.067 -1.321,20.091 3.461,20.091
  rectangle net 5V: 3.658,22.53 5.893,24.13
  rectangle net GND: 46.866,14.122 48.136,34.569
  rectangle net NetLED1_1: 45.491,13.081 46.126,15.215
  rectangle net 3.3V: 42.647,18.542 43.434,19.558
  rectangle net LCD_DB17: 43.866,16.586 45.136,24.536
  rectangle net LCD_DB17: 39.497,15.9 45.136,18.034
  rectangle net 3.3V: 19.279,31.013 20.091,33.249
  rectangle net EN_: 20.803,31.013 23.52,31.979
  rectangle net 3.3V: 19.279,32.283 25.372,33.249
  rectangle net GND: 18.237,33.477 48.136,34.595
Bottom Layer:
  region net 5V: 0.686,2.362 0.686,13.691 -1.016,13.691 -1.016,2.362
  rectangle net 5V: -0.94,12.065 5.632,13.689
  region net 5V: 4.342,29.572 4.342,12.065 5.74,12.065 5.74,29.572

## Silkscreen, mask and mechanical layers (free items; w line width, h text height)
Top Overlay:
  lines w0.178: 2.642,22.758 2.946,22.758
  lines w0.254: 19.355,34.595 20.866,34.595 21.057,34.404 21.057,34.138
  text "RESET" at 7.264,36.114 h1.02
  text "SIDE-MAIN PCB CONNECTOR" at 6.198,26.365 h1.02 r90
  text "BOOT" at 43.766,15.519 h1.02
  text "IO45" at 43.84,11.1 h1.02
  text "DB0" at 43.84,8.507 h1.02
  text "DB12" at 43.777,5.817 h1.02
  text "POGO" at 0.847,3.25 h1.02
  text "LCD" at 35.751,-0.457 h1.02
  text "CONNECTOR" at 35.749,-1.346 h1.02
Bottom Overlay:
  drawing of 3075 lines, arcs and shapes, not listed
  text "ZERO CARBON FOOTPRINT" at 34.62,13.894 h0.97
Board Outline:
  the board outline again, w0.254
Fabrication:
  drawing of 191 lines, arcs and shapes, not listed
  text "Layer" at 63.769,39.827 h1.52
  text "Name" at 74.18,39.827 h1.52
  text "Material" at 97.796,39.827 h1.52
  text "Thickness" at 119.634,39.827 h1.52
  text "Constant" at 136.14,39.827 h1.52
  text "Board Layer Stack" at 150.614,39.827 h1.52
  text "Top Overlay" at 74.18,36.779 h1.52
  text "Top Solder" at 74.18,33.731 h1.52
  text "Solder Resist" at 97.796,33.731 h1.52
  text "3.00mil" at 119.634,33.731 h1.52
  text "3.5" at 136.14,33.731 h1.52
  text "1" at 63.769,30.683 h1.52
  text "Top Layer" at 74.18,30.683 h1.52
  text "10.00mil" at 119.634,30.683 h1.52
  text "Dielectric 1" at 74.18,27.635 h1.52
  text "FR-4" at 97.796,27.635 h1.52
  text "37.00mil" at 119.634,27.635 h1.52
  text "4.8" at 136.14,27.635 h1.52
  text "2" at 63.769,24.587 h1.52
  text "Bottom Layer" at 74.18,24.587 h1.52
  text "10.00mil" at 119.634,24.587 h1.52
  text "Bottom Solder" at 74.18,21.539 h1.52
  text "Solder Resist" at 97.796,21.539 h1.52
  text "3.00mil" at 119.634,21.539 h1.52
  text "3.5" at 136.14,21.539 h1.52
  text "Bottom Overlay" at 74.18,18.491 h1.52
  text "Total board thickness:" at 63.769,15.443 h1.52
  text "63.00mil" at 119.634,15.443 h1.52
Drill Drawing:
  circle w0.254: c-1.066,64.855 r0.847
  lines w0.254: -1.912,60.198 -1.066,60.621 -0.219,60.198 -0.642,61.045 -0.219,61.891 -1.066,61.468 -1.912,61.891 -1.489,61.045 -1.912,60.198 ; -1.912,67.818 -0.219,67.818 -0.219,69.511 -1.912,69.511 -1.912,67.818 ; -1.912,72.051 -1.489,72.051 -1.066,71.628 -0.642,72.051 -0.219,72.051 -0.642,72.475 -0.219,72.898 -0.642,72.898 -1.066,73.321 -1.489,72.898 -1.912,72.898 -1.489,72.475 -1.912,72.051
  lines w0.381: -3.431,59.055 186.56,59.055 ; -3.431,74.295 186.56,74.295 ; 10.561,55.245 10.561,78.105 ; 25.289,55.245 25.289,78.105 ; 52.967,55.245 52.967,78.105 ; 65.816,55.245 65.816,78.105 ; 84.455,55.245 84.455,78.105 ; 122.544,55.245 122.544,78.105 ; 137.526,55.245 137.526,78.105 ; 156.469,55.245 156.469,78.105 ; -3.431,55.245 186.56,55.245 186.56,78.105 -3.431,78.105 -3.431,55.245
  text "Symbol" at -1.145,75.438 h1.83
  text "Count" at 11.704,75.438 h1.83
  text "Hole Size" at 26.432,75.438 h1.83
  text "Plated" at 54.11,75.438 h1.83
  text "Hole Type" at 66.959,75.438 h1.83
  text "Drill Layer Pair" at 85.598,75.438 h1.83
  text "Via/Pad" at 123.687,75.438 h1.83
  text "Pad Shape" at 138.669,75.438 h1.83
  text "Template" at 157.612,75.438 h1.83
  text "110" at 11.704,71.628 h1.52
  text "0.300mm (11.81mil)" at 26.432,71.628 h1.52
  text "PTH" at 54.11,71.628 h1.52
  text "Round" at 66.959,71.628 h1.52
  text "Top Layer - Bottom Layer" at 85.598,71.628 h1.52
  text "Via" at 123.687,71.628 h1.52
  text "Rounded" at 138.669,71.628 h1.52
  text "(Mixed)" at 157.612,71.628 h1.52
  text "2" at 11.704,67.818 h1.52
  text "0.500mm (19.69mil)" at 26.432,67.818 h1.52
  text "PTH" at 54.11,67.818 h1.52
  text "Slot" at 66.959,67.818 h1.52
  text "Top Layer - Bottom Layer" at 85.598,67.818 h1.52
  text "Pad" at 123.687,67.818 h1.52
  text "Rounded" at 138.669,67.818 h1.52
  text "r80_155h50_115r100" at 157.612,67.818 h1.52
  text "2" at 11.704,64.008 h1.52
  text "0.550mm (21.65mil)" at 26.432,64.008 h1.52
  text "PTH" at 54.11,64.008 h1.52
  text "Slot" at 66.959,64.008 h1.52
  text "Top Layer - Bottom Layer" at 85.598,64.008 h1.52
  text "Pad" at 123.687,64.008 h1.52
  text "Rounded" at 138.669,64.008 h1.52
  text "r100_125h55_85r100" at 157.612,64.008 h1.52
  text "4" at 11.704,60.198 h1.52
  text "2.100mm (82.68mil)" at 26.432,60.198 h1.52
  text "PTH" at 54.11,60.198 h1.52
  text "Round" at 66.959,60.198 h1.52
  text "Top Layer - Bottom Layer" at 85.598,60.198 h1.52
  text "Pad" at 123.687,60.198 h1.52
  text "Rounded" at 138.669,60.198 h1.52
  text "c250h210m255" at 157.612,60.198 h1.52
  text "118 Total" at 11.704,56.388 h1.52
  text "Slot definitions :" at -1.145,52.705 h1.52
  text "Routed Path Length" at 25.085,52.705 h1.52
  text "= Calculated from tool start centre position to tool end centre position." at 53.093,52.705 h1.52
  text "Hole Length" at 25.085,50.166 h1.52
  text "= Routed Path Length + Tool Size = Slot length as defined in the PCB layout" at 42.682,50.166 h1.52

## Dimensions
48.412,-1.499 to -1.499,-1.499 on Dimension
48.412,41.783 to 48.412,-1.499 on Dimension

## Text inside footprints (layer, text, board x,y; h text height)
J2: Top Overlay "Board Edge" at -0.961,20.672 h0.5 r270